# Altium PCB PCB-Thermostat.PcbDoc (part 4 of 4)
Units mil, origin at the board's own origin, x right, y up, seen from the top; angles counter-clockwise.
Board outline 3937.01 x 3543.31 mil, 4 copper layers (Top, PWR, GND, Bottom), stack 62.417 mil thick; 123 components, 131 nets, 527 pads, 279 vias.
Unrouted connection lines stored in the file: 2.
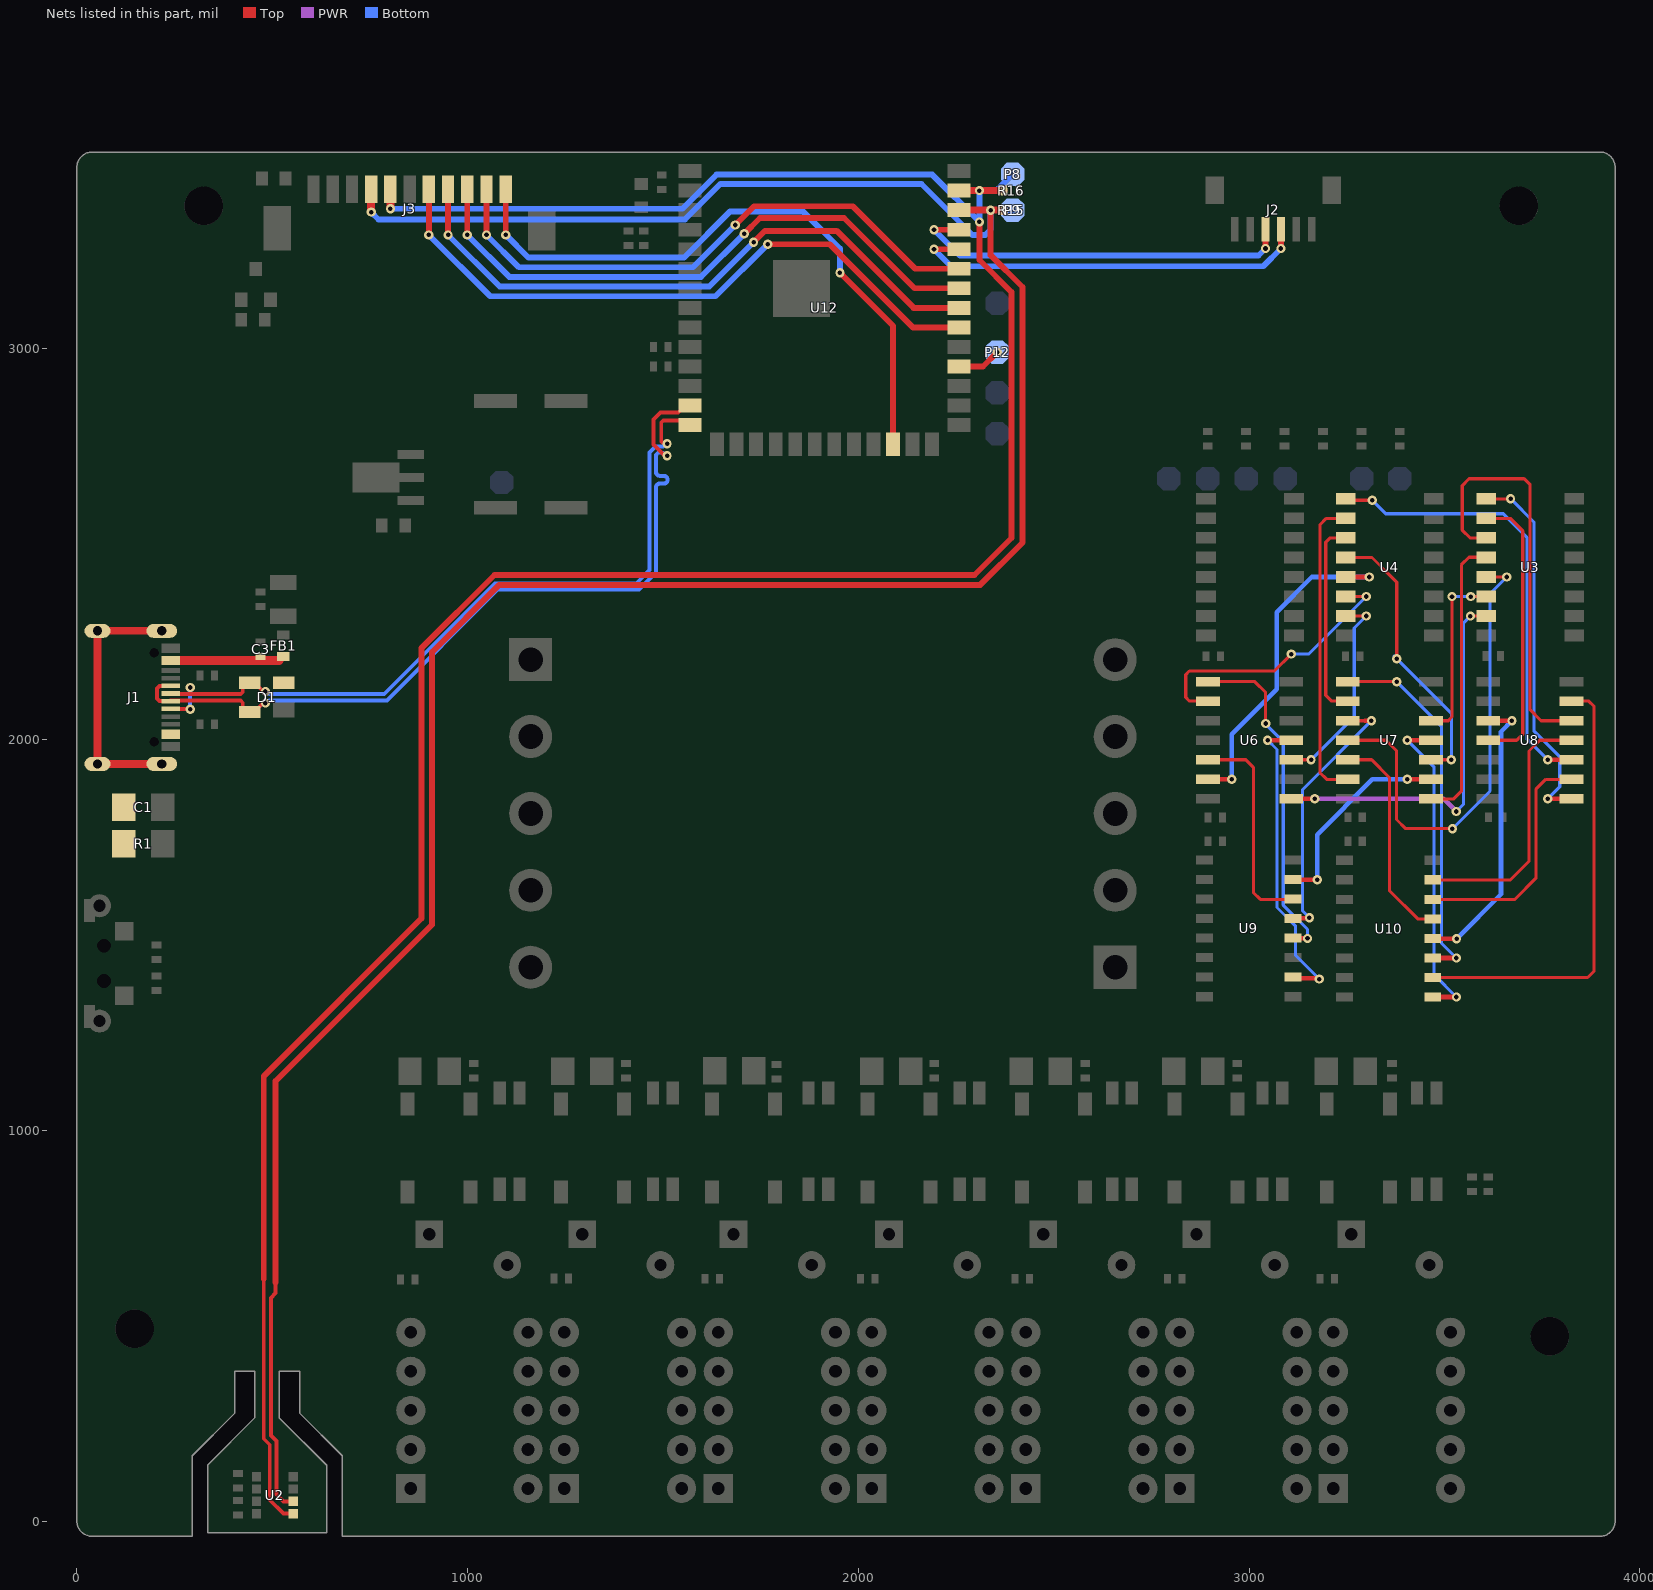
[diagram p5: the nets of this part, all layers, seen from the top]

## Via types
v1: diameter 23.62, hole 11.81, Top to Bottom, 261 vias
v2: diameter 31.5, hole 15.75, Top to Bottom, 14 vias
v3: diameter 23.62, hole 11.81, Top to Bottom, tented top, 4 vias

## Nets (pads, with @x,y where several pads share a name; then routed paths per layer and width w, separated by ;. In a path a pad name is that pad's centre, name@x,y a point inside that pad or via, vN(x,y) a via of type N, cw(c..) or ccw(c..) an arc to the next point about the centre after c; other vN are vias at no path point) (continued)
RLY_R2: U7.10 U9.5 | length 691.7
  Top w8: U7.10@3249.19,2048.38 U7.10@3252.81,2048.38 3296.63,2048.38
  Top w11.81: U9.5@3112.99,1541.11 3114.99,1543.11 3153.62,1543.11 v1(3154.64,1544.13) ; 3296.63,2048.38 v1(3313.24,2048.38)
  Bottom w7.87: 3136.76,1871.9 v1(3313.24,2048.38)
  Bottom w8: 3136.76,1871.9 3136.76,1562 v1(3154.64,1544.13)
RLY_R3: U7.2 U9.7 | length 563.2
  Top w8: v1@3408.05,1898.38 U7.2@3444.07,1898.38
  Top w11.81: U9.7@3112.99,1641.11 3113.47,1641.59 3173.89,1641.59 v1(3174.39,1641.09) ; v1(3404.97,1898.38) 3408.05,1898.38 U7.2@3465.4,1898.38
  Bottom w11.81: v1(3174.39,1641.09) 3174.39,1756.87 3315.89,1898.38 v1(3404.97,1898.38)
RLY_R4: U8.6 U10.2 | length 1187.4
  Top w8: U10.2@3470.33,1391.09 3866.61,1391.09 3883.32,1407.81 3883.32,2084.78 3869.72,2098.38 U8.6@3798.4,2098.38
RLY_R5: U8.10 U10.4 | length 746.9
  Top w8: U8.10@3603.52,2048.38 U8.10@3612.45,2048.38 U8.10@3636.79,2048.38
  Top w11.81: U10.4@3470.33,1491.09 3470.81,1490.61 v1(3531.24,1490.61) ; U8.10@3636.79,2048.38 v1(3672.88,2048.38)
  Bottom w11.81: v1(3531.24,1490.61) 3644.85,1604.22 3644.85,2020.34 v1(3672.88,2048.38)
RLY_R6: U8.2 U10.6 | length 588.9
  Top w8: U10.6@3470.33,1591.09 3680.61,1591.09 3734.25,1644.73 3734.25,1872.72 3759.91,1898.38 U8.2@3798.4,1898.38
RLY_S0: U6.4 U9.2 | length 794.7
  Top w11.81: v1(3047.62,1998.38) U6.4@3108.05,1998.38 ; U9.2@3112.97,1391.09 3114.68,1389.39 3177.38,1389.39 v1(3179.64,1387.13)
  Bottom w8: v1(3047.62,1998.38) 3071.45,1974.54 3071.45,1570.31 3119.39,1522.38 3119.39,1447.38 v1(3179.64,1387.13)
RLY_S1: U6.8 U9.4 | length 869.6
  Top w8: U6.8@2895.45,2148.38 3014.94,2148.38 3042.64,2120.68 v1(3042.64,2041.13)
  Top w11.81: U9.4@3113,1491.13 3113.49,1491.61 3149.15,1491.61 v1(3149.64,1491.13)
  Bottom w8: v1(3042.64,2041.13) 3042.64,2039.13 3087.59,1994.18 3087.59,1576.44 3149.64,1514.39 v1(3149.64,1491.13)
RLY_S2: U6.12 U9.6 | length 532.3
  Top w8: U6.12@2894.86,1948.38 2991.79,1948.38 3011.3,1928.87 3011.3,1608.85 3029.05,1591.09 U9.6@3091.71,1591.09
RLY_S3: U7.4 U10.1 | length 890.7
  Top w11.81: v1(3404.97,1998.38) U7.4@3465.4,1998.38 ; U10.1@3470.33,1341.09 v1(3530.76,1341.09) U10.1@3470.33,1341.09
  Bottom w8: v1(3404.97,1998.38) 3473.7,1929.65 3473.7,1398.15 v1(3530.76,1341.09)
RLY_S4: U7.8 U10.3 | length 956.2
  Top w8: U7.8@3252.81,2148.38 v1(3378.11,2148.38)
  Top w11.81: U10.3@3470.33,1441.09 v1(3530.76,1441.09)
  Bottom w8: v1(3378.11,2148.38) 3492.3,2034.19 3492.3,1479.55 v1(3530.76,1441.09)
RLY_S5: U7.12 U10.5 | length 555.8
  Top w8: U7.12@3252.81,1948.38 3313.78,1948.38 3359.39,1902.76 3359.39,1613.3 3431.59,1541.09 U10.5@3470.33,1541.09
RLY_S6: U8.4 U10.7 | length 641.5
  Top w8: U10.7@3470.33,1641.09 3669.23,1641.09 3716.55,1688.41 3716.55,1970.8 3744.13,1998.38 U8.4@3798.4,1998.38
RLYRSTN0: U3.15 U6.1 | length 985
  Top w8: v1@3562.64,2316.13 v1(3566.64,2316.13) U3.15@3596.8,2316.13
  Top w11.81: U6.1@3108.05,1848.38 v1(3168.48,1848.38)
  PWR w12: v1(3168.48,1848.38) 3498.39,1848.38 v1(3530.64,1816.13)
  Bottom w8: v1(3530.64,1816.13) 3548.53,1834.01 3548.53,2298.01 v1(3566.64,2316.13)
RLYRSTN1: U3.14 U7.5 | length 471.1
  Top w8: U7.5@3444.07,2048.38 U7.5@3465.4,2048.38 3483.25,2048.38 3509.89,2048.38 3519.64,2058.13 v1(3519.64,2366.13) ; v1@3563.64,2366.13 v1(3567.64,2366.13) U3.14@3599.16,2366.13
  Bottom w8: v1(3519.64,2366.13) v1(3567.64,2366.13)
RLYRSTN2: U3.13 U7.11 | length 1218.8
  Top w8: U7.11@3252.81,1998.38 3350.59,1998.38 3377.36,1971.61 3377.36,1795.66 3400.89,1772.13 v1(3520.64,1772.13) ; U3.13@3606.94,2416.29 v1(3659.43,2416.29)
  Bottom w8: v1(3520.64,1772.13) 3616.7,1868.18 3616.7,2373.56 v1(3659.43,2416.29)
RLYRSTN3: U3.12 U7.1 | length 754.6
  Top w8: U7.1@3444.07,1848.38 3524.43,1848.38 3543.48,1867.43 3543.48,2447.39 3562.98,2466.88 3601.95,2466.88 U3.12@3602.54,2466.29
RLYRSTN4: U3.11 U8.5 | length 1033.2
  Top w8: U3.11@3602.54,2516.29 3565.47,2516.29 3545.64,2536.13 3545.64,2650.14 3563.17,2667.67 3704.09,2667.67 3719.51,2652.25 3719.51,2076.11 3747.24,2048.38 U8.5@3798.4,2048.38
RLYRSTN5: U3.10 U8.11 | length 735.1
  Top w8: U3.10@3602.54,2566.29 3668.47,2566.29 3700.64,2534.13 3700.64,2014.13 3684.89,1998.38 U8.11@3612.45,1998.38 U8.11@3603.52,1998.38
RLYRSTN6: U3.9 U8.1 | length 961.4
  Top w8: U3.9@3602.54,2616.29 U3.9@3606.94,2616.29 3669.27,2616.29 v1(3669.47,2616.49) ; 3785.66,1849.11 3786.4,1848.38
  Top w11.81: v1(3764.62,1848.38) 3786.4,1848.38 U8.1@3825.05,1848.38
  Bottom w8: v1(3669.47,2616.49) 3729.16,2556.8 3729.16,2022.58 3795.23,1956.5 3795.23,1878.99 v1(3764.62,1848.38)
RLYSETN0: U4.15 U6.3 | length 529.6
  Top w8: U6.3@3108.05,1948.38 v1(3158.89,1948.38) ; U4.15@3247.29,2316.29 v1(3299.78,2316.29)
  Bottom w8: v1(3158.89,1948.38) 3269.21,2058.7 3269.21,2285.72 v1(3299.78,2316.29)
RLYSETN1: U4.14 U6.9 | length 718.7
  Top w8: U6.9@2894.86,2098.38 2847.61,2098.38 2837.98,2108.01 2837.98,2166.12 2847.4,2175.54 3064.6,2175.54 v1(3107.91,2218.85) ; U4.14@3247.29,2366.29 U4.14@3248.21,2366.29 ; U4.14@3249.98,2364.52 U4.14@3248.21,2366.29 ; v1(3299.78,2366.29) U4.14@3248.21,2366.29
  Bottom w8: v1(3107.91,2218.85) 3152.34,2218.85 v1(3299.78,2366.29)
RLYSETN2: U4.13 U6.13 | length 871.2
  Top w8: U6.13@2894.86,1898.38 U6.13@2895.45,1898.38
  Top w11.81: U6.13@2895.45,1898.38 v1(2955.88,1898.38) ; U4.13@3247.29,2416.29 v1(3307.73,2416.29)
  Bottom w11.81: v1(2955.88,1898.38) 2955.88,2013.7 3070.64,2128.45 3070.64,2326.13 3160.8,2416.29 v1(3307.73,2416.29)
RLYSETN3: U4.12 U7.3 | length 770.1
  Top w8: U4.12@3248.21,2466.29 3314.94,2466.29 3378.13,2403.1 v1(3378.13,2207.04) ; U7.3@3444.07,1948.38 U7.3@3484.1,1948.38 ; U7.3@3465.4,1948.38 U7.3@3484.1,1948.38 ; v1(3517.89,1948.38) U7.3@3484.1,1948.38
  Bottom w8: v1@3371.82,2213.34 3517.89,2067.28 v1(3517.89,1948.38)
RLYSETN4: U4.11 U7.9 | length 506
  Top w8: U4.11@3247.29,2516.29 3207.8,2516.29 3196.51,2505 3196.51,2113.25 3211.39,2098.38 U7.9@3249.19,2098.38
RLYSETN5: U4.10 U7.13 | length 782.5
  Top w8: U4.10@3248.21,2566.29 3198.01,2566.29 3181.64,2549.92 3181.64,1915.3 3198.56,1898.38 U7.13@3249.19,1898.38
RLYSETN6: U4.9 U8.3 | length 1155.6
  Top w8: U4.9@3248.21,2616.29 3251.95,2612.55 v1(3315.14,2612.55)
  Top w11.81: v1(3764.62,1948.38) U8.3@3825.05,1948.38
  Bottom w8: v1(3315.14,2612.55) 3349.56,2578.13 3650.65,2578.13 3711.06,2517.72 3711.06,2001.94 v1(3764.62,1948.38)
RXD: J2.4 U12.36 | length 1038.7
  Top w15: v1(2193.64,3255.13) U12.36@2257.87,3255.12 ; v1(3081.69,3256.96) J2.4@3081.69,3306.67
  Bottom w15: v1(2193.64,3255.13) 2237.07,3211.7 3036.42,3211.7 v1(3081.69,3256.96)
SCL: J3.5 P8.1 R16.1 U2.4 U12.39 | length 6840.2
  Top w10: 478.24,619.37 478.24,210.53 493.64,195.13 493.64,54.13 528.88,18.88 U2.4@553.88,18.88
  Top w15: 478.24,619.37 478.24,1138.72 881.64,1542.13 881.64,2233.72 1069.02,2421.1 2297.29,2421.1 2392.17,2515.97 2392.17,3145.31 2310,3227.48 v1(2310,3325.13)
  Top w18: U12.39@2257.87,3405.12 2338.63,3405.12 R16.1@2373.14,3405.12
  Top w20: v1(802.36,3358.8) J3.5@802.36,3409
  Bottom w15: v1(802.36,3358.8) 1549.86,3358.8 1637.06,3446 2189.13,3446 v1(2310,3325.13) v1(2310,3405.13) 2353.13,3405.13 P8.1@2395,3447
SCLK: P12.1 U12.30 | length 112.9
  Top w15: U12.30@2257.87,2955.12 2319.11,2955.12 v1(2355.65,2991.66)
SDA: J3.4 P9.1 R15.1 U2.3 U12.38 | length 6868.7
  Top w10: 508.64,610.63 508.64,583.13 496.68,571.17 496.68,219.08 510.64,205.13 510.64,68.13 528.39,50.38 U2.3@553.88,50.38
  Top w15: 508.64,610.63 508.64,1126.13 908.64,1526.13 908.64,2223.78 1080.96,2396.1 2312.23,2396.1 2420.18,2504.04 2420.18,3158.21 2338.64,3239.75 v1(2338.64,3355.13)
  Top w18: U12.38@2257.87,3355.12 v1(2338.64,3355.13) R15.1@2373.14,3355.12
  Top w20: v1(753.15,3350.06) J3.4@753.15,3409
  Bottom w10: v1@2337.64,3355.13 v1@2338.14,3354.63 ; v1@2338.64,3354.13 v1@2340.14,3352.63
  Bottom w15: v1(753.15,3350.06) 772.12,3331.09 1556.09,3331.09 1647,3422 2161.79,3422 2292.01,3291.78 2324.78,3291.78 2338.64,3305.64 2338.64,3354.13 v1(2338.64,3355.13) P9.1@2395,3355.13
SH: C1.1 J1.S1 J1.S2 J1.S3 J1.S4 R1.2 | length 669.7
  Top w19.68: J1.S1@217.31,1937.83 J1.S2@52.74,1937.83 J1.S3@52.74,2278.38 J1.S4@217.31,2278.38
TXD: J2.3 U12.37 | length 995.3
  Top w15: v1(2193.64,3305.12) U12.37@2255.63,3305.12 ; v1(3042.32,3256.96) J2.3@3042.32,3306.67
  Bottom w15: v1(2193.64,3305.12) 2259.87,3238.89 3024.24,3238.89 v1(3042.32,3256.96)
USB_N: D1.4 J1.A7 J1.B7 U12.13 | length 2095.5
  Top w10: J1.A7@239.75,2098.26 238.85,2099.17 211.37,2099.17 205.51,2105.02 205.51,2130.87 211.37,2136.72 238.85,2136.72 J1.B7@239.75,2137.63 ; J1.A7@239.75,2100.27 418.61,2100.27 424.47,2094.41 424.47,2081.61 435.22,2070.87 D1.4@442.52,2070.87 454.33,2070.87 474.31,2090.85 479.97,2090.85 v1(482.58,2093.46) ; v1@1501.23,2729.42 1475.64,2755.01 1475.64,2819.55 1493.21,2837.13 1539.1,2837.13 1554.1,2852.13 U12.13@1569.66,2852.13
  Bottom w10: v1(482.58,2093.46) 486.26,2093.46 493.07,2100.27 646.54,2100.27 793.27,2100.27 1077.13,2384.13 1438.64,2384.13 1481.95,2427.43 1481.95,2620.14 1481.95,2645.14 cw(c1491.95,2645.14) 1491.95,2655.14 1501.95,2655.14 ccw(c1501.95,2665.14) 1501.95,2675.14 1491.95,2675.14 cw(c1491.95,2685.14) 1481.95,2685.14 1481.95,2701.26 1481.95,2728.26 1487.8,2734.12 1499.62,2734.12 1506.93,2726.81 v1(1510.62,2726.81)
USB_P: D1.3 J1.A6 J1.B6 U12.14 | length 1986.3
  Top w10: J1.B6@239.75,2078.57 240.31,2078.02 289.45,2078.02 v1(290.01,2077.46) ; J1.A6@239.75,2116.27 418.61,2116.27 424.47,2122.13 424.47,2134.92 435.22,2145.67 D1.3@442.52,2145.67 454.33,2145.67 474.31,2125.69 479.97,2125.69 v1(482.58,2123.08) ; 1498.89,2760.04 1495.64,2763.29 1495.64,2811.27 1501.5,2817.13 1554.66,2817.13 U12.14@1569.66,2802.13
  Bottom w10: v1(290.01,2077.46) v1(290.01,2133.3) ; v1(482.58,2123.08) 486.26,2123.08 493.07,2116.27 786.64,2116.27 1070.5,2400.13 1432.01,2400.13 1465.95,2434.06 1465.95,2446.33 1465.95,2566.46 1465.95,2620.14 1465.95,2734.89 1481.18,2750.12 1499.62,2750.12 1506.93,2757.43 v1(1510.62,2757.43)
VBUS: C3.1 D1.2 FB1.1 J1.A4/B9 J1.B4/A9 | length 292.2
  Top w10: J1.B4/A9@234.84,2018.53 J1.B4/A9@239.75,2013.61 ; J1.A4/B9@234.84,2197.68 J1.A4/B9@239.75,2202.59
  Top w22: J1.A4/B9@239.75,2202.59 FB1.1@518.1,2202.59
X1: J3.10 U12.35 | length 1491.9
  Top w15: v1(1048.43,3291.79) J3.10@1048.43,3409 ; v1(1685,3317) 1733.13,3365.13 1985.64,3365.13 2145.65,3205.12 U12.35@2257.87,3205.12
  Bottom w15: v1(1048.43,3291.79) 1131.17,3209.04 1577.04,3209.04 v1(1685,3317)
X5: J3.11 U12.24 | length 1642.6
  Top w12: U12.24@2088.58,2755.9 U12.24@2089.04,2756.36
  Top w15: v1(1097.64,3291.82) J3.11@1097.64,3409 ; v1(1953,3195) 2089.04,3058.96 U12.24@2089.04,2756.36
  Bottom w15: v1(1097.64,3291.82) 1155.86,3233.6 1553.66,3233.6 1672.06,3352 1857.78,3352 1953,3256.78 v1(1953,3195)
Y2: J3.9 U12.34 | length 1557.3
  Top w15: v1(999.21,3291.79) J3.9@999.21,3409 ; v1(1708,3295) 1748.13,3335.13 1963.64,3335.13 2143.65,3155.12 U12.34@2257.87,3155.12
  Bottom w15: v1(999.21,3291.79) 1106.51,3184.49 1597.49,3184.49 v1(1708,3295)
Y3: J3.8 U12.33 | length 1620.5
  Top w15: v1(950,3291.79) J3.8@950,3409 ; v1(1732,3273) 1761.13,3302.13 1944.64,3302.13 2141.65,3105.12 U12.33@2257.87,3105.12
  Bottom w15: v1(950,3291.79) 1082.23,3159.55 1618.55,3159.55 v1(1732,3273)
Y4: J3.7 U12.32 | length 1682.8
  Top w15: v1(900.79,3291.79) J3.7@900.79,3409 ; v1(1768,3268) 1926.76,3268 2139.65,3055.12 U12.32@2257.87,3055.12
  Bottom w15: v1(900.79,3291.79) 1057.95,3134.62 1634.62,3134.62 v1(1768,3268)
pads on no net: J1.A8 J1.B8 J1.MH J3.MP1 J3.MP2 SW1.3 SW1.4 SW1.5 SW1.6 SW1.MH0 SW1.MH1 U3.7 U4.7 U5.7 U6.5 U6.6 U6.10 U6.11 U8.8 U8.9 U8.12 U8.13 U12.8 U12.9 U12.15 U12.16 U12.18 U12.19 U12.20 U12.26

## Polygon pours and split planes (outlines as drawn)
GND on Top "GND_L01_P016" (solid, remove dead copper, pour order 16): 20.64,88.99 ccw(c119.23,68.46) 72.75,-20.87 270.64,-20.87 270.64,185.13 379.64,294.13 379.64,408.13 454.72,408.13 517.72,408.13 598.64,408.13 598.64,289.13 703.16,184.6 703.16,-20.87 3752.95,-20.87 ccw(c3776.47,129.15) 3920.83,82 3920.83,3430.94 ccw(c3860.75,3424.45) 3860.75,3484.87 48,3484.87 ccw(c52.08,3453.08) 20.64,3459.3
+5V on Top "+5V_L01_P014" (solid, pour order 14): 494.87,2382.45 494.87,2515 565,2515 565,2982 795,2982 795,2709.07 825.33,2709.07 825.23,2692.55 888.88,2692.55 888.88,2649.52 824.98,2649.52 824.88,2632.96 795,2632.96 795,2382.45
+3V3 on Top "+3V3_L01_P015" (solid, pour order 15): 820.77,2982 1153.64,2982 1153.64,2470 1003,2470 1003,2718.65 820.77,2718.65
VBUS on Top "VBUS_L01_P013" (solid, pour order 13): 230.56,2214.13 106.64,2214.13 106.64,2006.05 230.56,2006.06
+3V3 on Bottom "+3V3_L04_P018" (solid, pour order 18): 997,2971 1170,2971 1170,2449.03 997,2449.03
GND on Bottom "GND_L04_P020" (solid, remove dead copper, pour order 20): 20.88,89.34 ccw(c119.48,68.81) 73,-20.53 270.88,-20.53 270.88,185.47 379.88,294.47 379.88,408.47 454.97,408.47 517.96,408.47 598.88,408.47 598.88,289.47 703.41,184.95 703.41,-20.53 3753.2,-20.53 ccw(c3801.57,107.96) 3920.7,39.72 3921.07,3431.29 ccw(c3861,3424.8) 3861,3485.22 48.25,3485.22 ccw(c52.32,3453.43) 20.88,3459.65
+3V3 on PWR "+3V3_L02_P021" (solid, remove dead copper, pour order 21): 20.64,88.99 ccw(c119.23,68.46) 72.75,-20.87 270.64,-20.87 270.64,185.13 379.64,294.13 379.64,408.13 454.72,408.13 517.72,408.13 598.64,408.13 598.64,289.13 703.16,184.6 703.16,-20.87 3752.95,-20.87 ccw(c3801.32,107.61) 3920.45,39.37 3920.83,3430.94 ccw(c3860.75,3424.45) 3860.75,3484.87 48,3484.87 ccw(c52.08,3453.08) 20.64,3459.3
+5V on PWR "+5V_L02_P019" (solid, pour order 19): 568.97,2850.15 569.97,2850.15 806.97,2850.15 806.97,2515.15 801.97,2515.15 564.97,2515.15 564.97,2850.15
GND on GND "GND_L03_P017" (solid, remove dead copper, pour order 17): 20.64,88.99 ccw(c119.23,68.46) 72.75,-20.87 270.64,-20.87 270.64,185.13 379.64,294.13 379.64,408.13 454.72,408.13 517.72,408.13 598.64,408.13 598.64,289.13 703.16,184.6 703.16,-20.87 3752.95,-20.87 ccw(c3801.32,107.61) 3920.45,39.37 3920.83,3430.94 ccw(c3860.75,3424.45) 3860.75,3484.87 48,3484.87 ccw(c52.08,3453.08) 20.64,3459.3

## Keep-outs
Top:
  region: 517.72,263.24 639.76,142.13 639.76,-29.53 334.65,-29.53 334.65,142.72 454.72,263.51 454.72,383.86 517.72,383.86
  region: 2901.79,1301.13 3571.08,1301.13 3571.08,-30.18 782.63,-30.53 782.63,1197.33 945.93,1365.57 945.93,2198.42 1075.64,2328.13 2901.79,2328.13
PWR:
  region: 517.72,263.24 639.76,142.13 639.76,-29.53 334.65,-29.53 334.65,142.72 454.72,263.51 454.72,383.86 517.72,383.86
  region: 2901.79,1301.13 3571.08,1301.13 3571.08,-30.18 782.63,-30.53 782.63,1197.33 945.93,1365.57 945.93,2198.42 1075.64,2328.13 2901.79,2328.13
GND:
  region: 517.72,263.24 639.76,142.13 639.76,-29.53 334.65,-29.53 334.65,142.72 454.72,263.51 454.72,383.86 517.72,383.86
  region: 2901.79,1301.13 3571.08,1301.13 3571.08,-30.18 782.63,-30.53 782.63,1197.33 945.93,1365.57 945.93,2198.42 1075.64,2328.13 2901.79,2328.13
Bottom:
  region: 517.72,263.24 639.76,142.13 639.76,-29.53 334.65,-29.53 334.65,142.72 454.72,263.51 454.72,383.86 517.72,383.86
  region: 2901.79,1301.13 3571.08,1301.13 3571.08,-30.18 782.63,-30.53 782.63,1197.33 945.93,1365.57 945.93,2198.42 1075.64,2328.13 2901.79,2328.13

## Other copper
Top:
  rectangle net USB_P: 278.05,2114.83 303.11,2144.98
  rectangle net NetC2_1: 512.72,2256.26 561.8,2349.32
  rectangle net NetC2_1: 457.58,2295.83 561.8,2349.32
  rectangle net VBUS: 501.57,2129.92 556.69,2224.77
  rectangle net VBUS: 324.22,2192.06 556.69,2224.77
  rectangle net GPIO5: 3369.07,2711.13 3403.07,2761.13
  rectangle net GPIO4: 3270.65,2711.13 3304.65,2761.13
  rectangle net E3: 3172.22,2703.13 3206.22,2761.13
  rectangle net GPIO9: 3073.8,2702.13 3107.8,2761.13
  rectangle net GPIO8: 2975.37,2704.13 3009.37,2761.13
  rectangle net SH: 21.64,1693.13 154.64,1942.13
  rectangle net GPIO7: 2877.64,2702.13 2911.64,2761.13
  rectangle net GND: 177.64,1692.13 260.64,1873.13
  region net GND: 334.65,2382.13 334.65,2254.13 278.05,2254.13 278.05,2316.13 251.64,2316.13 251.64,2382.13
  region net +3V3: 1527.35,3384.37 1599.19,3384.37 1599.19,3422.83 1483.71,3422.83 1483.71,3392.82 1379,3392.82 1379,3481 1307,3481 1307,3329.13 1467.64,3329.13
  region net GND: 393.95,1993.13 393.95,1857.13 274.64,1857.13 274.64,1993.13
PWR:
  pour cut-out: 1377,3385 1377,3485 1483,3485 1483,3385
  pour cut-out: 249.71,2389 249.71,2316 278,2316 278,2309.2 278,2250.35 327,2250.35 327,2389
  pour cut-out: 271,1976.36 271,1853 387,1853 387,1976.36
  pour cut-out: 1187,2471 1187,2641 1372,2641 1372,2471
  pour cut-out: 876,2507 876,2622 991,2622 991,2507
GND:
  pour cut-out: 1295,3399 1295,3485 1380,3485 1380,3399
  pour cut-out: 1007.13,2580 1007.13,2469 1155.85,2469 1155.85,2580 1140,2580
  pour cut-out: 588,2778 588,2583 788,2583 789,2582 789,2777 788,2778
Bottom:
  rectangle net +5V: 569.12,2433.95 816.71,2965.39
  pour cut-out: 1295,3399 1295,3485 1380,3485 1380,3399

## Silkscreen, mask and mechanical layers (free items; w line width, h text height)
Top Overlay:
  text "%" at 1478.11,3459.51 h25
  text "JLCJLCJLCJLC" at 1717.64,3453.85 h60
  text "%" at 450.79,2391.17 h25
  text "%" at 3556.98,2232.83 h25 r270
  text "%" at 2839.84,2231.88 h25 r270
  text "%" at 3197.84,2232 h25 r270
  text "%" at 3202.31,1820.16 h25 r270
  text "%" at 3562.26,1820.38 h25 r270
  text "%" at 2845.75,1819.18 h25 r270
  text "Thermostat" at 428.64,1761.87 h80
  text "%" at 2845.79,1758.91 h25 r270
  text "%" at 3201.84,1759.04 h25 r270
  text "revB" at 617.03,1706.39 h80
  text "%" at 184.42,1487.73 h25
  text "#" at 818.14,1193.63 h45
  text "#" at 1209.14,1193.63 h45
  text "#" at 1599.64,1193.63 h45
  text "#" at 2000.14,1193.63 h45
  text "#" at 2382.14,1193.63 h45
  text "#" at 2773.14,1193.63 h45
  text "#" at 3163.14,1193.63 h45
  text "$" at 998.39,1183.13 h45
  text "$" at 1388.39,1183.13 h45
  text "$" at 2177.39,1183.13 h45
  text "$" at 2563.39,1183.13 h45
  text "$" at 2952.39,1183.13 h45
  text "$" at 3348.39,1183.13 h45
  text "$" at 1772.39,1181.13 h45
  text "*" at 1075.64,1118.57 h45
  text "*" at 1467.64,1118.57 h45
  text "*" at 1872.55,1118.57 h45
  text "*" at 2252.64,1118.57 h45
  text "*" at 2642.64,1118.57 h45
  text "*" at 3027.64,1118.57 h45
  text "*" at 3422.64,1118.57 h45
  text "&" at 3138.01,982.13 h45
  text "&" at 787.01,981.13 h45
  text "&" at 1180.01,981.13 h45
  text "&" at 1566.01,981.13 h45
  text "&" at 1965.01,981.13 h45
  text "&" at 2358.01,981.13 h45
  text "&" at 2748.01,980.13 h45
  text "@" at 1274.28,611.62 h40
  text "@" at 1660.57,610.82 h40
  text "@" at 2058.57,610.99 h40
  text "@" at 2454.28,610.82 h40
  text "@" at 2844.57,610.82 h40
  text "@" at 3234.28,610.82 h40
  text "@" at 881.57,608.99 h40
  text "%" at 393.64,135.13 h25
  text "%" at 431.64,7.13 h25 r180
Bottom Overlay:
  text "SCL" at 2554.92,3420 h60
  text "SDA" at 2562.6,3327 h60
  text "CS" at 2314.99,3087.12 h60
  text "SCLK" at 2314.99,2964.66 h60
  text "MISO" at 2315.6,2859 h60
  text "MOSI" at 2315.6,2755.79 h60
  text "RLYADDR0" at 2866.87,2707.44 h60 r270
  text "RLYADDR1" at 2964.88,2707.96 h60 r270
  text "RLYADDR2" at 3065.88,2707.44 h60 r270
  text "RLYSTS" at 2766.27,2706.04 h60 r270
  text "RLYSET" at 3260.85,2706.1 h60 r270
  text "RLYRST" at 3359.09,2706.08 h60 r270
  text "3V3" at 1047.6,2631 h60
  text "Note:" at 774.64,990.13 h70
  text "$>> R13_Relay0,R13_Relay6" at 779.64,918.07 h60
  text "@>> R12_Relay0,R12_Relay6" at 779.64,849.43 h60
  text "&>> BR1_Relay0,BR1_Relay6" at 779.64,780.43 h60
  text "#>> C31_Relay0,C31_Relay6" at 779.64,717.87 h60
  text "*>> U13_Relay0,U13_Relay6" at 779.64,654.91 h60
  text "%>> 100nF 0402" at 779.64,576.08 h60
Dimension:
  circle w0.5: c147.64,492.13 r49.21
  circle w0.5: c853.94,485.43 r15.75
  circle w0.5: c853.94,385.43 r15.75
  circle w0.5: c853.94,285.43 r15.75
  circle w0.5: c853.94,185.43 r15.75
  circle w0.5: c853.94,85.43 r15.75
  circle w0.5: c1153.94,485.43 r15.75
  circle w0.5: c1153.94,385.43 r15.75
  circle w0.5: c1153.94,285.43 r15.75
  circle w0.5: c1247.64,485.43 r15.75
  circle w0.5: c1247.64,385.43 r15.75
  circle w0.5: c1247.64,285.43 r15.75
  circle w0.5: c1153.94,185.43 r15.75
  circle w0.5: c1153.94,85.43 r15.75
  circle w0.5: c1247.64,185.43 r15.75
  circle w0.5: c1247.64,85.43 r15.75
  circle w0.5: c1547.64,485.43 r15.75
  circle w0.5: c1547.64,385.43 r15.75
  circle w0.5: c1641.34,485.43 r15.75
  circle w0.5: c1641.34,385.43 r15.75
  circle w0.5: c1547.64,285.43 r15.75
  circle w0.5: c1641.34,285.43 r15.75
  circle w0.5: c1547.64,185.43 r15.75
  circle w0.5: c1641.34,185.43 r15.75
  circle w0.5: c1547.64,85.43 r15.75
  circle w0.5: c1641.34,85.43 r15.75
  circle w0.5: c1941.34,485.43 r15.75
  circle w0.5: c2035.04,485.43 r15.75
  circle w0.5: c1941.34,385.43 r15.75
  circle w0.5: c2035.04,385.43 r15.75
  circle w0.5: c1941.34,285.43 r15.75
  circle w0.5: c2035.04,285.43 r15.75
  circle w0.5: c2335.04,485.43 r15.75
  circle w0.5: c2335.04,385.43 r15.75
  circle w0.5: c2335.04,285.43 r15.75
  circle w0.5: c1941.34,185.43 r15.75
  circle w0.5: c2035.04,185.43 r15.75
  circle w0.5: c1941.34,85.43 r15.75
  circle w0.5: c2035.04,85.43 r15.75
  circle w0.5: c2335.04,185.43 r15.75
  circle w0.5: c2335.04,85.43 r15.75
  circle w0.5: c2428.74,485.43 r15.75
  circle w0.5: c2428.74,385.43 r15.75
  circle w0.5: c2428.74,285.43 r15.75
  circle w0.5: c2728.74,485.43 r15.75
  circle w0.5: c2728.74,385.43 r15.75
  circle w0.5: c2822.44,485.43 r15.75
  circle w0.5: c2822.44,385.43 r15.75
  circle w0.5: c2728.74,285.43 r15.75
  circle w0.5: c2822.44,285.43 r15.75
  circle w0.5: c2428.74,185.43 r15.75
  circle w0.5: c2428.74,85.43 r15.75
  circle w0.5: c2728.74,185.43 r15.75
  circle w0.5: c2822.44,185.43 r15.75
  circle w0.5: c2728.74,85.43 r15.75
  circle w0.5: c2822.44,85.43 r15.75
  circle w0.5: c3122.44,485.43 r15.75
  circle w0.5: c3216.14,485.43 r15.75
  circle w0.5: c3122.44,385.43 r15.75
  circle w0.5: c3216.14,385.43 r15.75
  circle w0.5: c3122.44,285.43 r15.75
  circle w0.5: c3216.14,285.43 r15.75
  circle w0.5: c3122.44,185.43 r15.75
  circle w0.5: c3216.14,185.43 r15.75
  circle w0.5: c3122.44,85.43 r15.75
  circle w0.5: c3216.14,85.43 r15.75
  circle w0.5: c3516.14,485.43 r15.75
  circle w0.5: c3516.14,385.43 r15.75
  circle w0.5: c3516.14,285.43 r15.75
  circle w0.5: c3769.69,472.44 r49.21
  circle w0.5: c3516.14,185.43 r15.75
  circle w0.5: c3516.14,85.43 r15.75
  lines w10: 758.64,-41.87 758.64,1993.13 758.64,-41.87
Board Outline:
  lines w10: 2386.64,3504.13 2387.14,3503.62 ; 0,0 ccw(c39.37,0) 39.37,-39.37 295.28,-39.37 295.28,167.32 403.54,275.59 403.54,383.86 454.72,383.86 454.72,263.78 334.65,142.72 334.65,-29.53 639.76,-29.53 639.76,142.72 517.72,263.78 517.72,383.86 570.87,383.86 570.87,275.59 679.13,167.32 679.13,-39.37 3897.64,-39.37 ccw(c3897.64,0) 3937.01,0 3937.01,3464.57 ccw(c3897.64,3464.57) 3897.64,3503.94 39.37,3503.94 ccw(c39.37,3464.57) 0,3464.57 0,0
Fabrication:
  drawing of 511 lines, arcs and shapes, not listed
  text "Layer" at 4868.5,5431.42 h60
  text "Name" at 5278.41,5431.42 h60
  text "Material" at 6208.16,5431.42 h60
  text "Thickness" at 7067.92,5431.42 h60
  text "Constant" at 7717.76,5431.42 h60
  text "Board Layer Stack" at 8287.62,5431.42 h60
  text "Top Overlay" at 5278.41,5311.42 h60
  text "Top Solder" at 5278.41,5191.42 h60
  text "Solder Resist" at 6208.16,5191.42 h60
  text "0.39mil" at 7067.92,5191.42 h60
  text "3.3" at 7717.76,5191.42 h60
  text "1" at 4868.5,5071.42 h60
  text "Top" at 5278.41,5071.42 h60
  text "1.38mil" at 7067.92,5071.42 h60
  text "Dielectric 4" at 5278.41,4951.42 h60
  text "PP-006" at 6208.16,4951.42 h60
  text "8.27mil" at 7067.92,4951.42 h60
  text "4.6" at 7717.76,4951.42 h60
  text "2" at 4868.5,4831.42 h60
  text "PWR" at 5278.41,4831.42 h60
  text "CF-004" at 6208.16,4831.42 h60
  text "0.60mil" at 7067.92,4831.42 h60
  text "Dielectric 1" at 5278.41,4711.42 h60
  text "FR-4" at 6208.16,4711.42 h60
  text "41.93mil" at 7067.92,4711.42 h60
  text "4.6" at 7717.76,4711.42 h60
  text "3" at 4868.5,4591.42 h60
  text "GND" at 5278.41,4591.42 h60
  text "CF-004" at 6208.16,4591.42 h60
  text "0.60mil" at 7067.92,4591.42 h60
  text "Dielectric 5" at 5278.41,4471.42 h60
  text "PP-006" at 6208.16,4471.42 h60
  text "8.27mil" at 7067.92,4471.42 h60
  text "4.6" at 7717.76,4471.42 h60
  text "4" at 4868.5,4351.42 h60
  text "Bottom" at 5278.41,4351.42 h60
  text "1.38mil" at 7067.92,4351.42 h60
  text "Bottom Solder" at 5278.41,4231.42 h60
  text "Solder Resist" at 6208.16,4231.42 h60
  text "0.39mil" at 7067.92,4231.42 h60
  text "3.3" at 7717.76,4231.42 h60
  text "Bottom Overlay" at 5278.41,4111.42 h60
  text "4-Layer Stackup 1.6mm FR4" at 1182.64,-179.08 h150
Mechanical 13:
  drawing of 8987 lines, arcs and shapes, not listed
Drill Drawing:
  circle w10: c72.62,6530.27 r20
  circle w10: c72.62,6530.27 r33.33
  lines w10: 39.29,6080.27 72.62,6046.94 105.96,6080.27 72.62,6113.61 39.29,6080.27 ; 39.29,6196.94 105.96,6196.94 105.96,6263.61 39.29,6263.61 39.29,6196.94 ; 39.29,6346.94 39.29,6363.61 55.96,6380.27 39.29,6396.94 39.29,6413.61 55.96,6413.61 72.62,6396.94 89.29,6413.61 105.96,6413.61 105.96,6396.94 89.29,6380.27 105.96,6363.61 105.96,6346.94 89.29,6346.94 72.62,6363.61 55.96,6346.94 39.29,6346.94 ; 39.29,6646.94 105.96,6646.94 105.96,6713.61 39.29,6713.61 39.29,6646.94 ; 39.29,6863.61 105.96,6863.61 72.62,6796.94 39.29,6863.61 ; 39.29,6963.61 55.96,6963.61 55.96,6946.94 89.29,6946.94 89.29,6963.61 105.96,6963.61 105.96,6996.94 89.29,6996.94 89.29,7013.61 55.96,7013.61 55.96,6996.94 39.29,6996.94 39.29,6963.61 ; 39.29,7163.61 105.96,7163.61 72.62,7096.94 39.29,7163.61 ; 39.29,7263.61 55.96,7263.61 72.62,7246.94 89.29,7263.61 105.96,7263.61 89.29,7280.27 105.96,7296.94 89.29,7296.94 72.62,7313.61 55.96,7296.94 39.29,7296.94 55.96,7280.27 39.29,7263.61 ; 39.29,7396.94 72.62,7413.61 105.96,7396.94 89.29,7430.27 105.96,7463.61 72.62,7446.94 39.29,7463.61 55.96,7430.27 39.29,7396.94 ; 52.62,6660.27 92.62,6660.27 92.62,6700.27 52.62,6700.27 52.62,6660.27 ; 52.62,6850.27 92.62,6850.27 72.62,6810.27 52.62,6850.27
  lines w15: -20.5,6001.94 13147.8,6001.94 ; -20.5,7501.94 13147.8,7501.94 ; 530.38,5851.94 530.38,7651.94 ; 1130.22,5851.94 1130.22,7651.94 ; 2229.9,5851.94 2229.9,7651.94 ; 2735.77,5851.94 2735.77,7651.94 ; 3469.57,5851.94 3469.57,7651.94 ; 4659.23,5851.94 4659.23,7651.94 ; 5249.08,5851.94 5249.08,7651.94 ; 5994.88,5851.94 5994.88,7651.94 ; 7134.54,5851.94 7134.54,7651.94 ; 7988.31,5851.94 7988.31,7651.94 ; 9321.91,5851.94 9321.91,7651.94 ; 10655.52,5851.94 10655.52,7651.94 ; 11745.2,5851.94 11745.2,7651.94 ; -20.5,5851.94 13147.8,5851.94 13147.8,7651.94 -20.5,7651.94 -20.5,5851.94
  text "Symbol" at 69.5,7546.94 h72
  text "Count" at 575.38,7546.94 h72
  text "Hole Size" at 1175.22,7546.94 h72
  text "Plated" at 2274.9,7546.94 h72
  text "Hole Type" at 2780.77,7546.94 h72
  text "Drill Layer Pair" at 3514.57,7546.94 h72
  text "Via/Pad" at 4704.23,7546.94 h72
  text "Pad Shape" at 5294.08,7546.94 h72
  text "Template" at 6039.88,7546.94 h72
  text "Description" at 7179.54,7546.94 h72
  text "Hole Tolerance (+)" at 8033.31,7546.94 h72
  text "Hole Tolerance (-)" at 9366.91,7546.94 h72
  text "Hole Length" at 10700.52,7546.94 h72
  text "Routed Path Length" at 11790.2,7546.94 h72
  text "2" at 575.38,7396.94 h60
  text "0.600mm (23.62mil)" at 1175.22,7396.94 h60
  text "PTH" at 2274.9,7396.94 h60
  text "Slot" at 2780.77,7396.94 h60
  text "Top - Bottom" at 3514.57,7396.94 h60
  text "Pad" at 4704.23,7396.94 h60
  text "Rounded" at 5294.08,7396.94 h60
  text "r90_170h60_140r100" at 6039.88,7396.94 h60
  text "1.400mm (55.12mil)" at 10700.52,7396.94 h60
  text "0.800mm (31.50mil)" at 11790.2,7396.94 h60
  text "2" at 575.38,7246.94 h60
  text "0.600mm (23.62mil)" at 1175.22,7246.94 h60
  text "PTH" at 2274.9,7246.94 h60
  text "Slot" at 2780.77,7246.94 h60
  text "Top - Bottom" at 3514.57,7246.94 h60
  text "Pad" at 4704.23,7246.94 h60
  text "Rounded" at 5294.08,7246.94 h60
  text "(Mixed)" at 6039.88,7246.94 h60
  text "1.700mm (66.93mil)" at 10700.52,7246.94 h60
  text "1.100mm (43.31mil)" at 11790.2,7246.94 h60
  text "2" at 575.38,7096.94 h60
  text "0.620mm (24.41mil)" at 1175.22,7096.94 h60
  text "NPTH" at 2274.9,7096.94 h60
  text "Round" at 2780.77,7096.94 h60
  text "Top - Bottom" at 3514.57,7096.94 h60
  text "Pad" at 4704.23,7096.94 h60
  text "Rounded" at 5294.08,7096.94 h60
  text "c0hn62" at 6039.88,7096.94 h60
  text "-" at 10700.52,7096.94 h60
  text "-" at 11790.2,7096.94 h60
  text "2" at 575.38,6946.94 h60
  text "0.900mm (35.43mil)" at 1175.22,6946.94 h60
  text "NPTH" at 2274.9,6946.94 h60
  text "Round" at 2780.77,6946.94 h60
  text "Top - Bottom" at 3514.57,6946.94 h60
  text "Pad" at 4704.23,6946.94 h60
  text "Rounded" at 5294.08,6946.94 h60
  text "c0hn90" at 6039.88,6946.94 h60
  text "-" at 10700.52,6946.94 h60
  text "-" at 11790.2,6946.94 h60
  text "4" at 575.38,6796.94 h60
  text "2.500mm (98.43mil)" at 1175.22,6796.94 h60
  text "NPTH" at 2274.9,6796.94 h60
  text "Round" at 2780.77,6796.94 h60
  text "Top - Bottom" at 3514.57,6796.94 h60
  text "Pad" at 4704.23,6796.94 h60
  text "Rounded" at 5294.08,6796.94 h60
  text "c250hn250" at 6039.88,6796.94 h60
  text "-" at 10700.52,6796.94 h60
  text "-" at 11790.2,6796.94 h60
  text "10" at 575.38,6646.94 h60
  text "1.600mm (62.99mil)" at 1175.22,6646.94 h60
  text "PTH" at 2274.9,6646.94 h60
  text "Round" at 2780.77,6646.94 h60
  text "Top - Bottom" at 3514.57,6646.94 h60
  text "Pad" at 4704.23,6646.94 h60
  text "(Mixed)" at 5294.08,6646.94 h60
  text "(Mixed)" at 6039.88,6646.94 h60
  text "-" at 10700.52,6646.94 h60
  text "-" at 11790.2,6646.94 h60
  text "14" at 575.38,6496.94 h60
  text "0.400mm (15.75mil)" at 1175.22,6496.94 h60
  text "PTH" at 2274.9,6496.94 h60
  text "Round" at 2780.77,6496.94 h60
  text "Top - Bottom" at 3514.57,6496.94 h60
  text "Via" at 4704.23,6496.94 h60
  text "Rounded" at 5294.08,6496.94 h60
  text "v80h40" at 6039.88,6496.94 h60
  text "-" at 10700.52,6496.94 h60
  text "-" at 11790.2,6496.94 h60
  text "16" at 575.38,6346.94 h60
  text "0.800mm (31.50mil)" at 1175.22,6346.94 h60
  text "PTH" at 2274.9,6346.94 h60
  text "Round" at 2780.77,6346.94 h60
  text "Top - Bottom" at 3514.57,6346.94 h60
  text "Pad" at 4704.23,6346.94 h60
  text "(Mixed)" at 5294.08,6346.94 h60
  text "(Mixed)" at 6039.88,6346.94 h60
  text "-" at 10700.52,6346.94 h60
  text "-" at 11790.2,6346.94 h60
  text "70" at 575.38,6196.94 h60
  text "0.820mm (32.28mil)" at 1175.22,6196.94 h60
  text "PTH" at 2274.9,6196.94 h60
  text "Round" at 2780.77,6196.94 h60
  text "Top - Bottom" at 3514.57,6196.94 h60
  text "Pad" at 4704.23,6196.94 h60
  text "(Mixed)" at 5294.08,6196.94 h60
  text "(Mixed)" at 6039.88,6196.94 h60
  text "-" at 10700.52,6196.94 h60
  text "-" at 11790.2,6196.94 h60
  text "265" at 575.38,6046.94 h60
  text "0.300mm (11.81mil)" at 1175.22,6046.94 h60
  text "PTH" at 2274.9,6046.94 h60
  text "Round" at 2780.77,6046.94 h60
  text "Top - Bottom" at 3514.57,6046.94 h60
  text "Via" at 4704.23,6046.94 h60
  text "Rounded" at 5294.08,6046.94 h60
  text "(Mixed)" at 6039.88,6046.94 h60
  text "-" at 10700.52,6046.94 h60
  text "-" at 11790.2,6046.94 h60
  text "387 Total" at 575.38,5896.94 h60
  text "Slot definitions :" at 69.5,5751.97 h60
  text "Routed Path Length" at 1102.19,5751.97 h60
  text "= Calculated from tool start centre position to tool end centre position." at 2204.86,5751.97 h60
  text "Hole Length" at 1102.19,5651.99 h60
  text "= Routed Path Length + Tool Size = Slot length as defined in the PCB layout" at 1794.99,5651.99 h60

## Dimensions
3897.64,3503.94 to 3937.01,0 on Dimension
0,0 to 3937.01,0 on Dimension

## Text inside footprints (layer, text, board x,y; h text height)
J1: Top Overlay "Board Edge" at 57.64,2253.13 h30 r270
J3: Top Overlay "PCB Edge" at 785.62,3233.22 h31.5